# Altium PCB ResearchProject_V5.PcbDoc (part 1 of 2)
Units mm, origin at the board's own origin, x right, y up, seen from the top; angles counter-clockwise.
Board outline 152.49 x 130.17 mm, 4 copper layers (Top Layer, GND, 3V3, Bottom Layer), stack 0.603 mm thick; 150 components, 186 nets, 766 pads, 209 vias.
Unrouted connection lines stored in the file: 6.
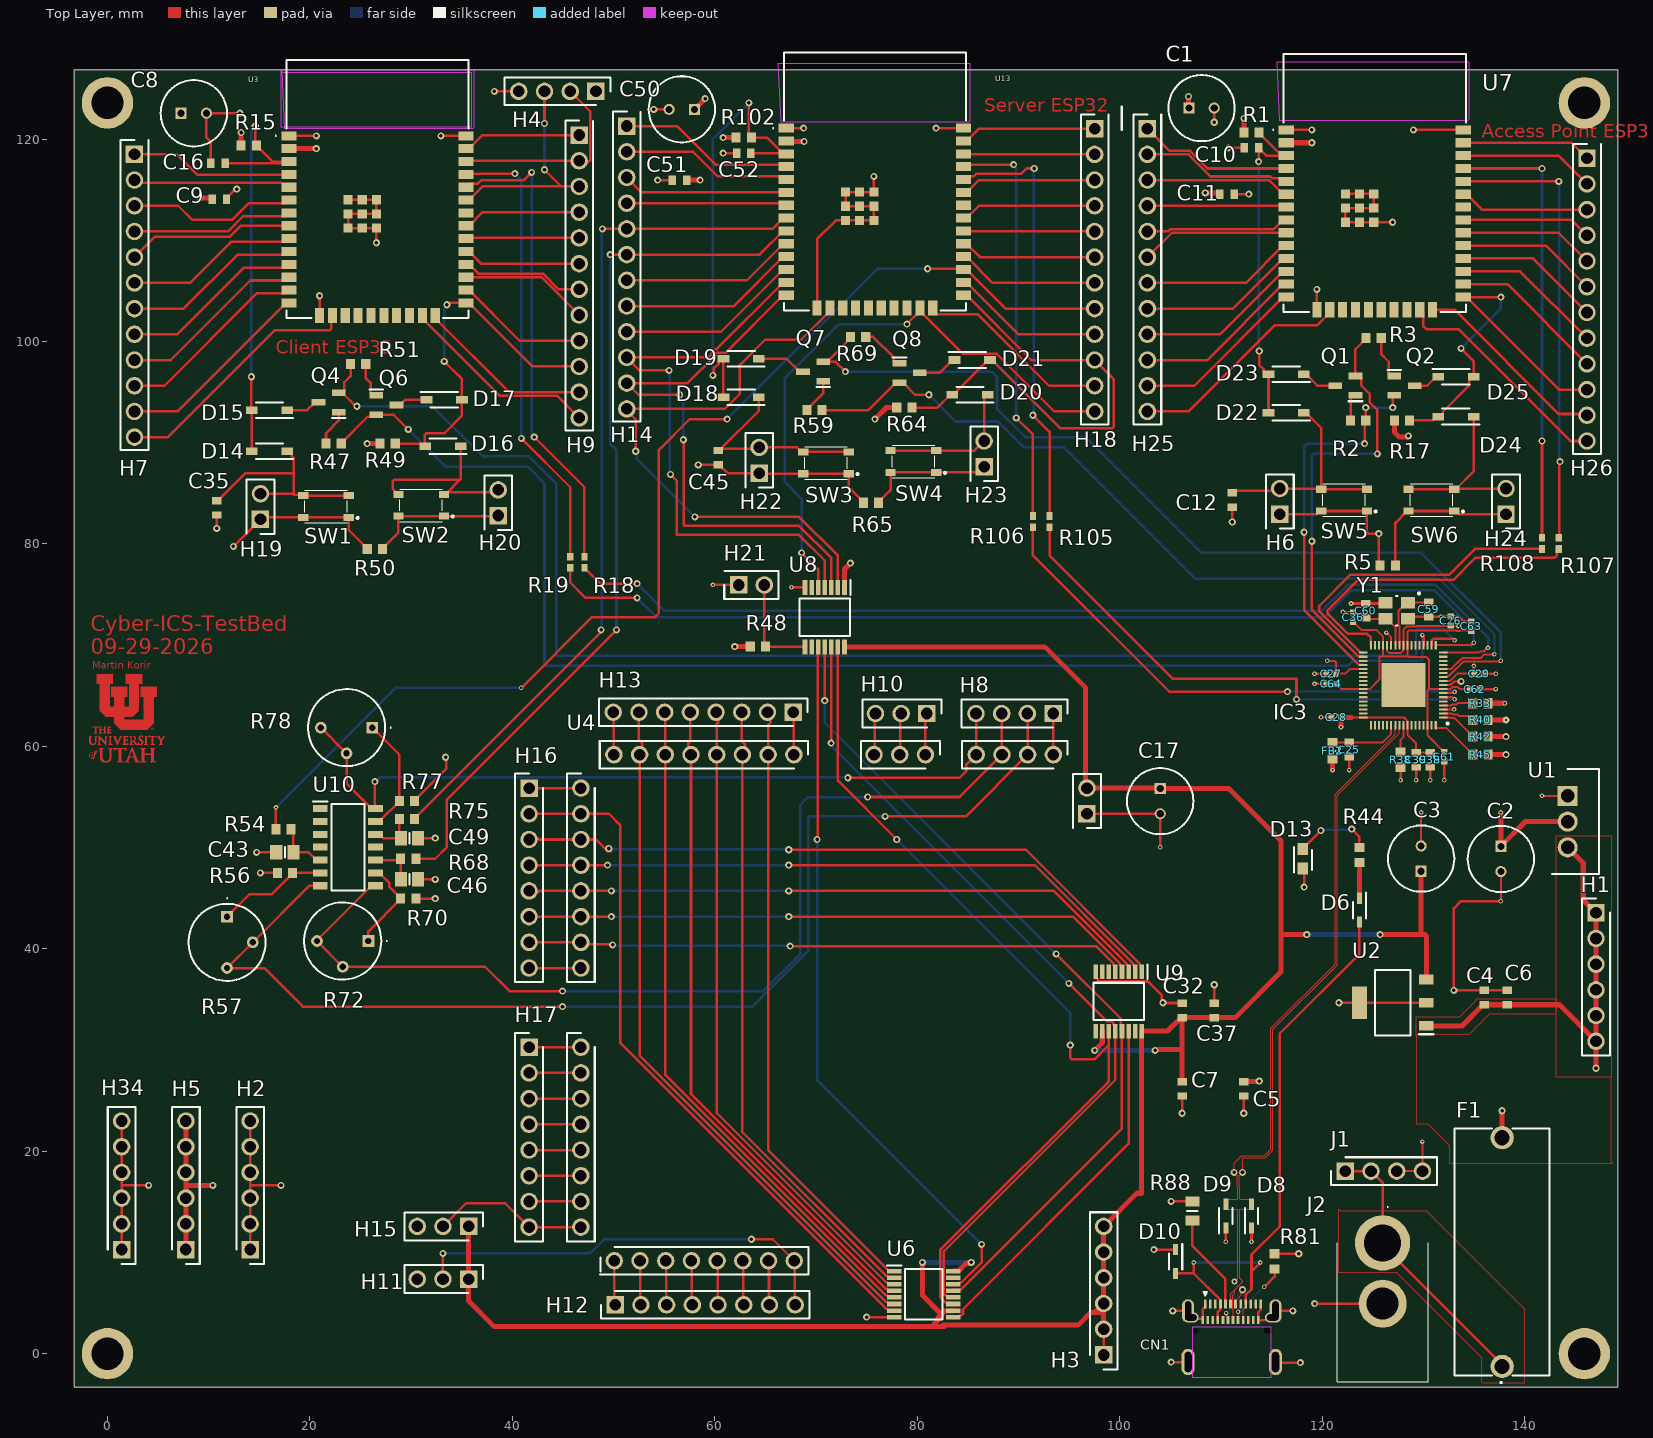
[diagram p0: Top Layer view]
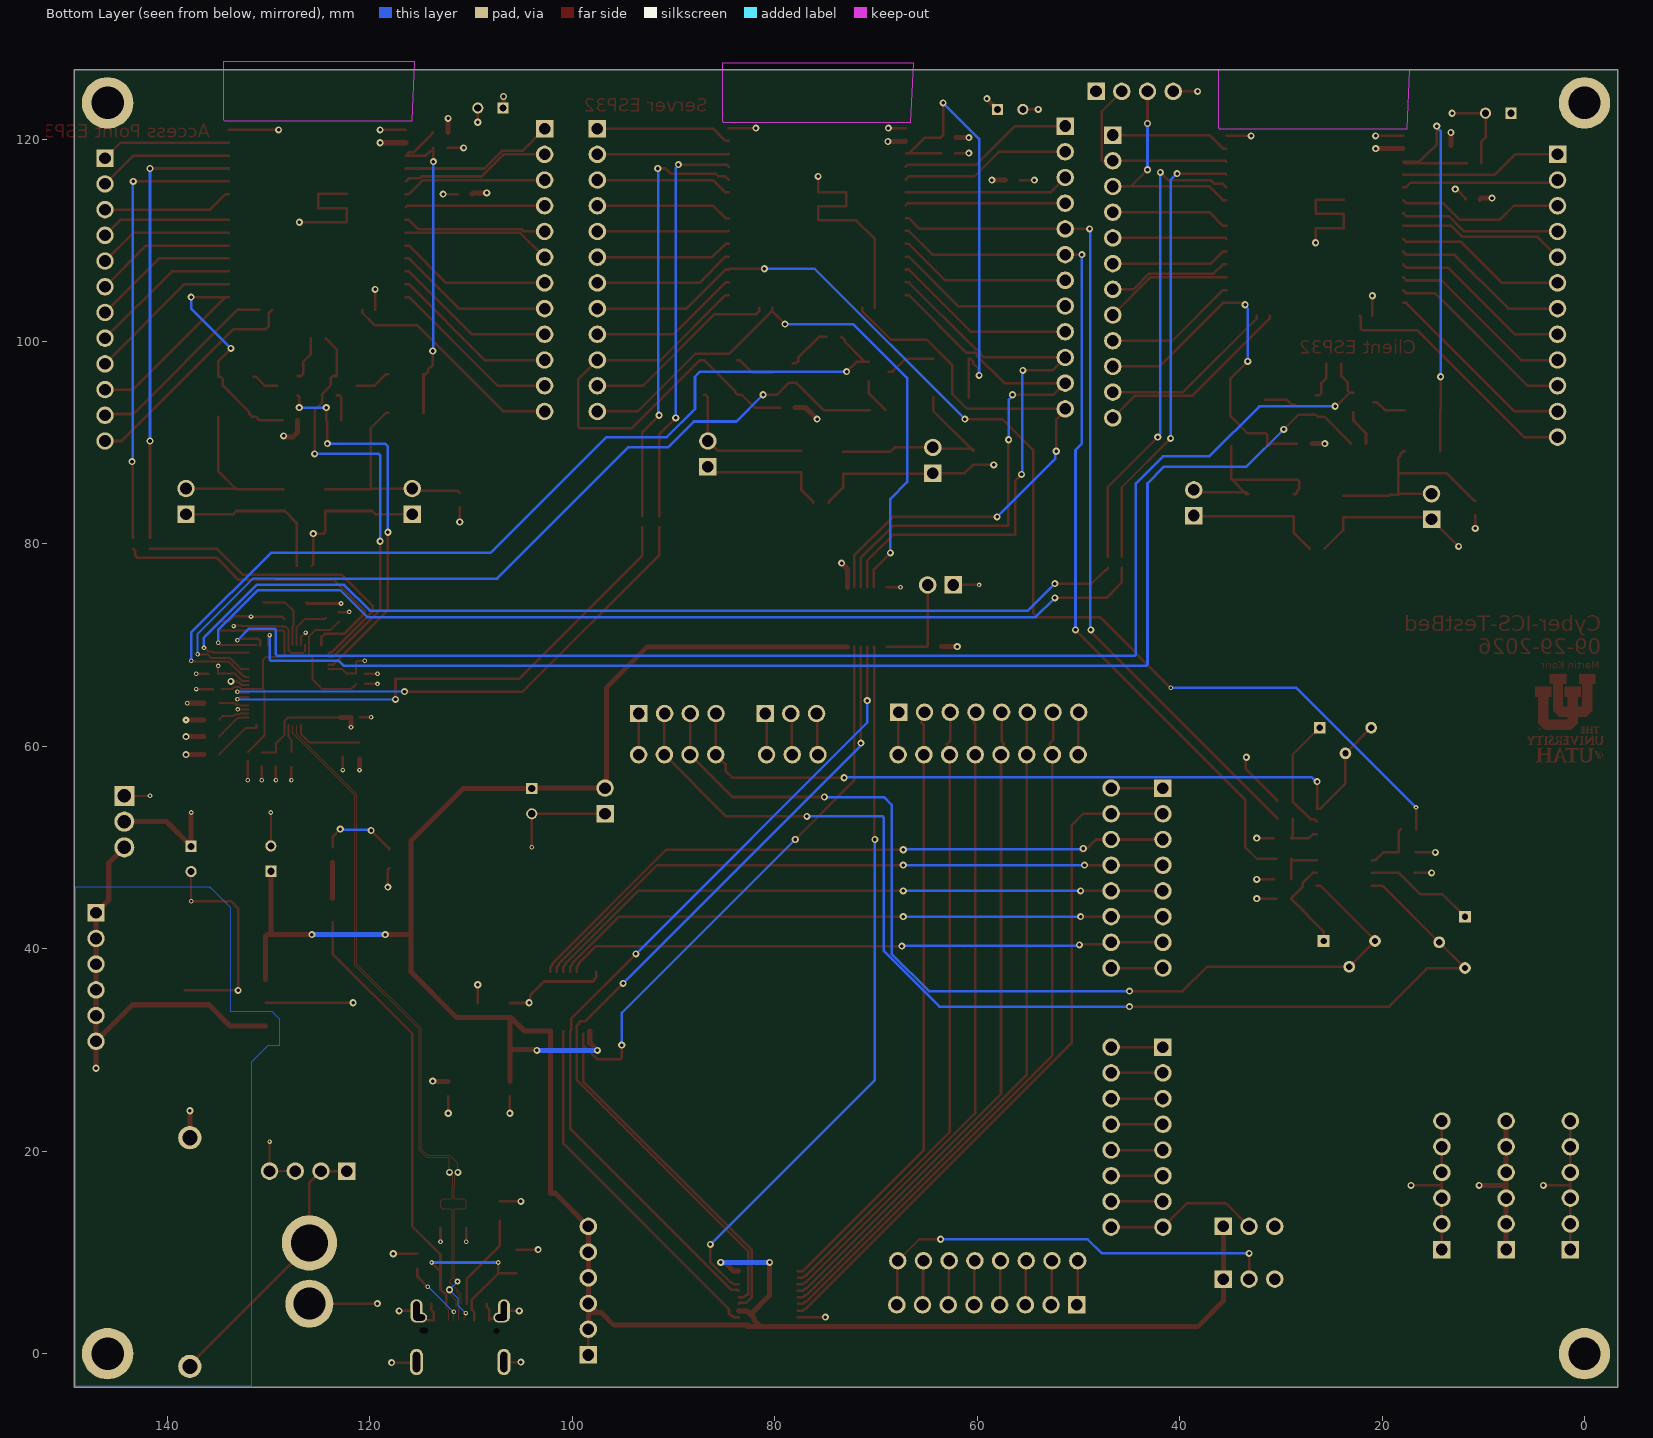
[diagram p1: Bottom Layer view, seen from below]
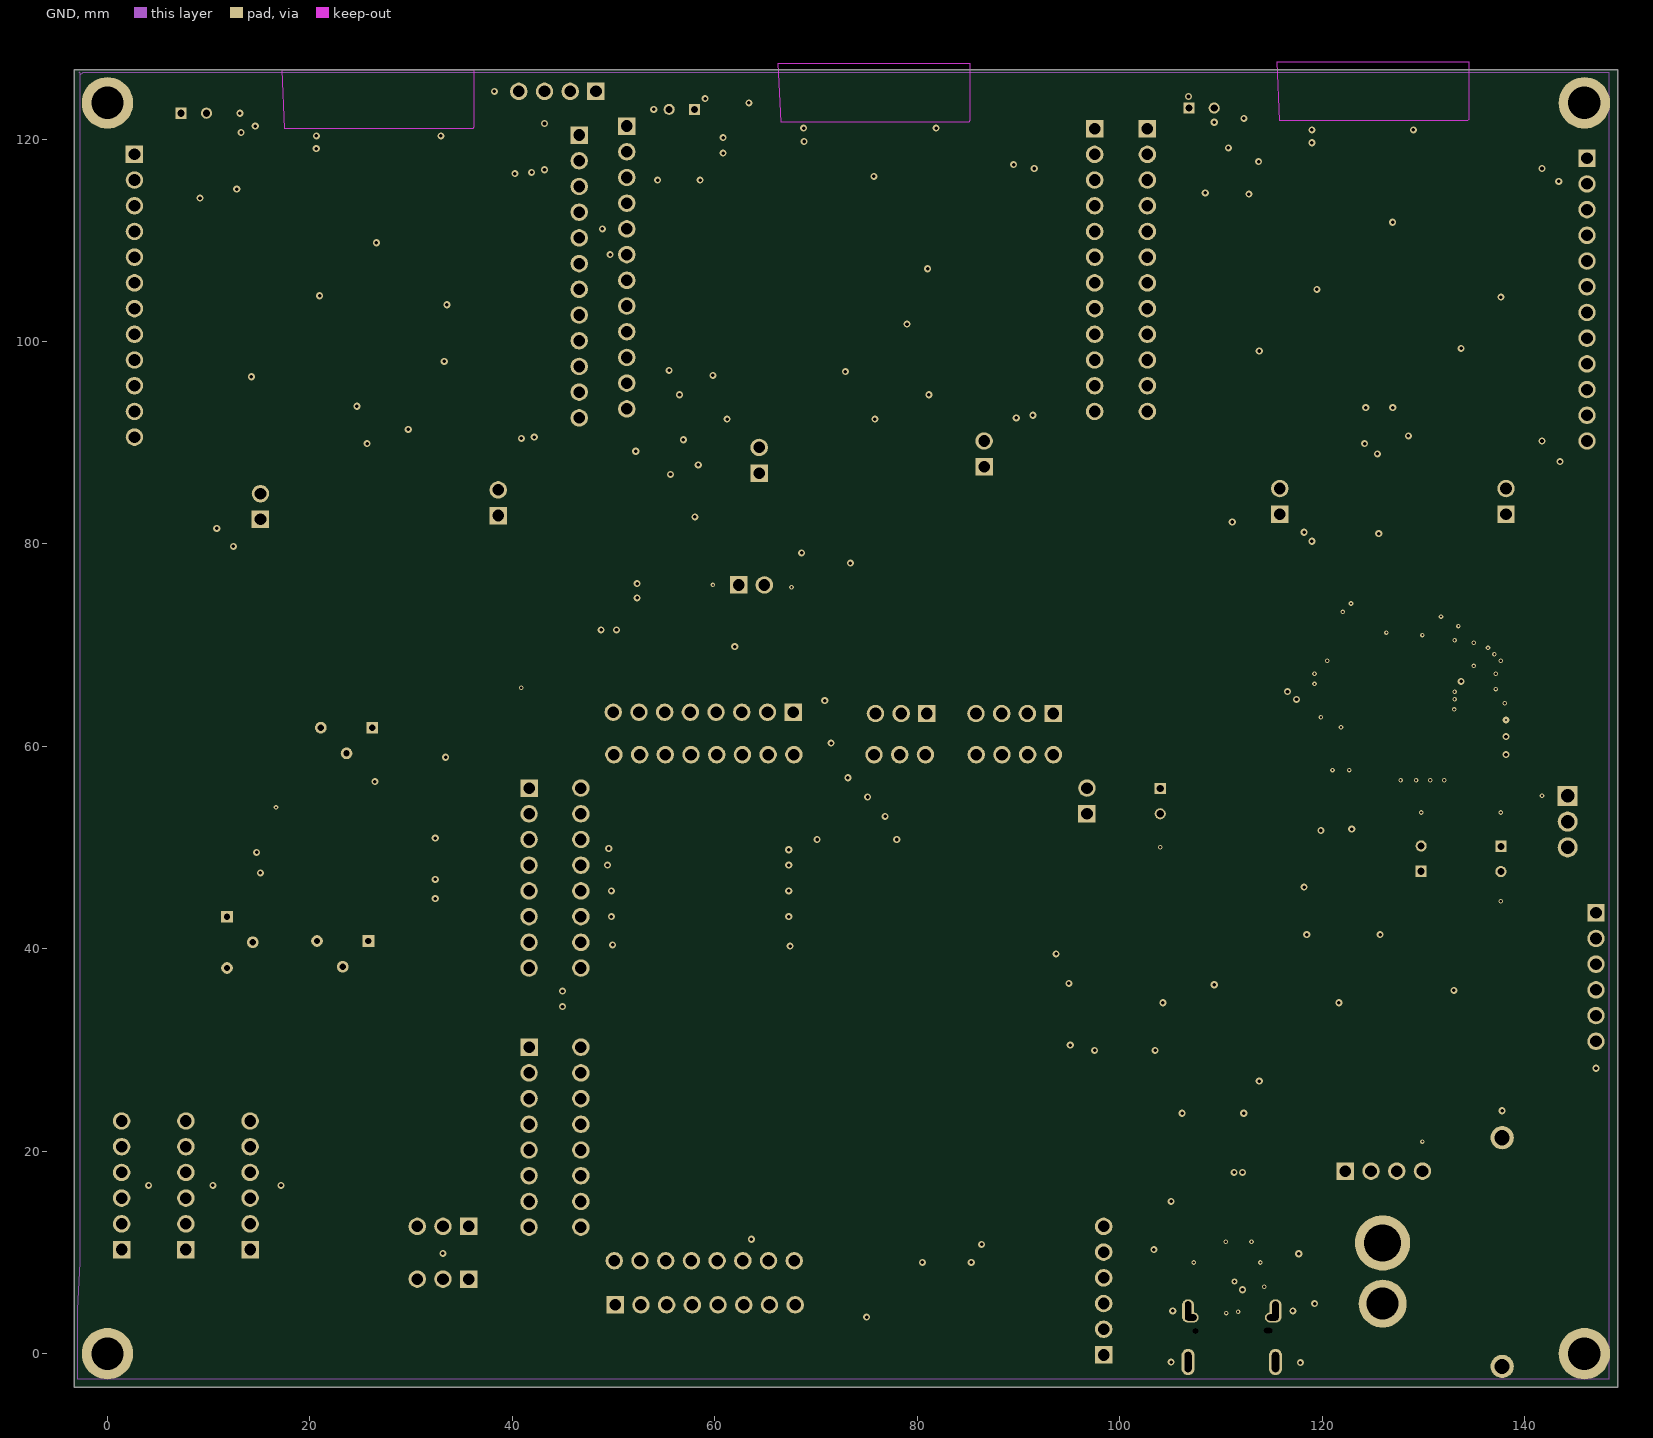
[diagram p2: GND]
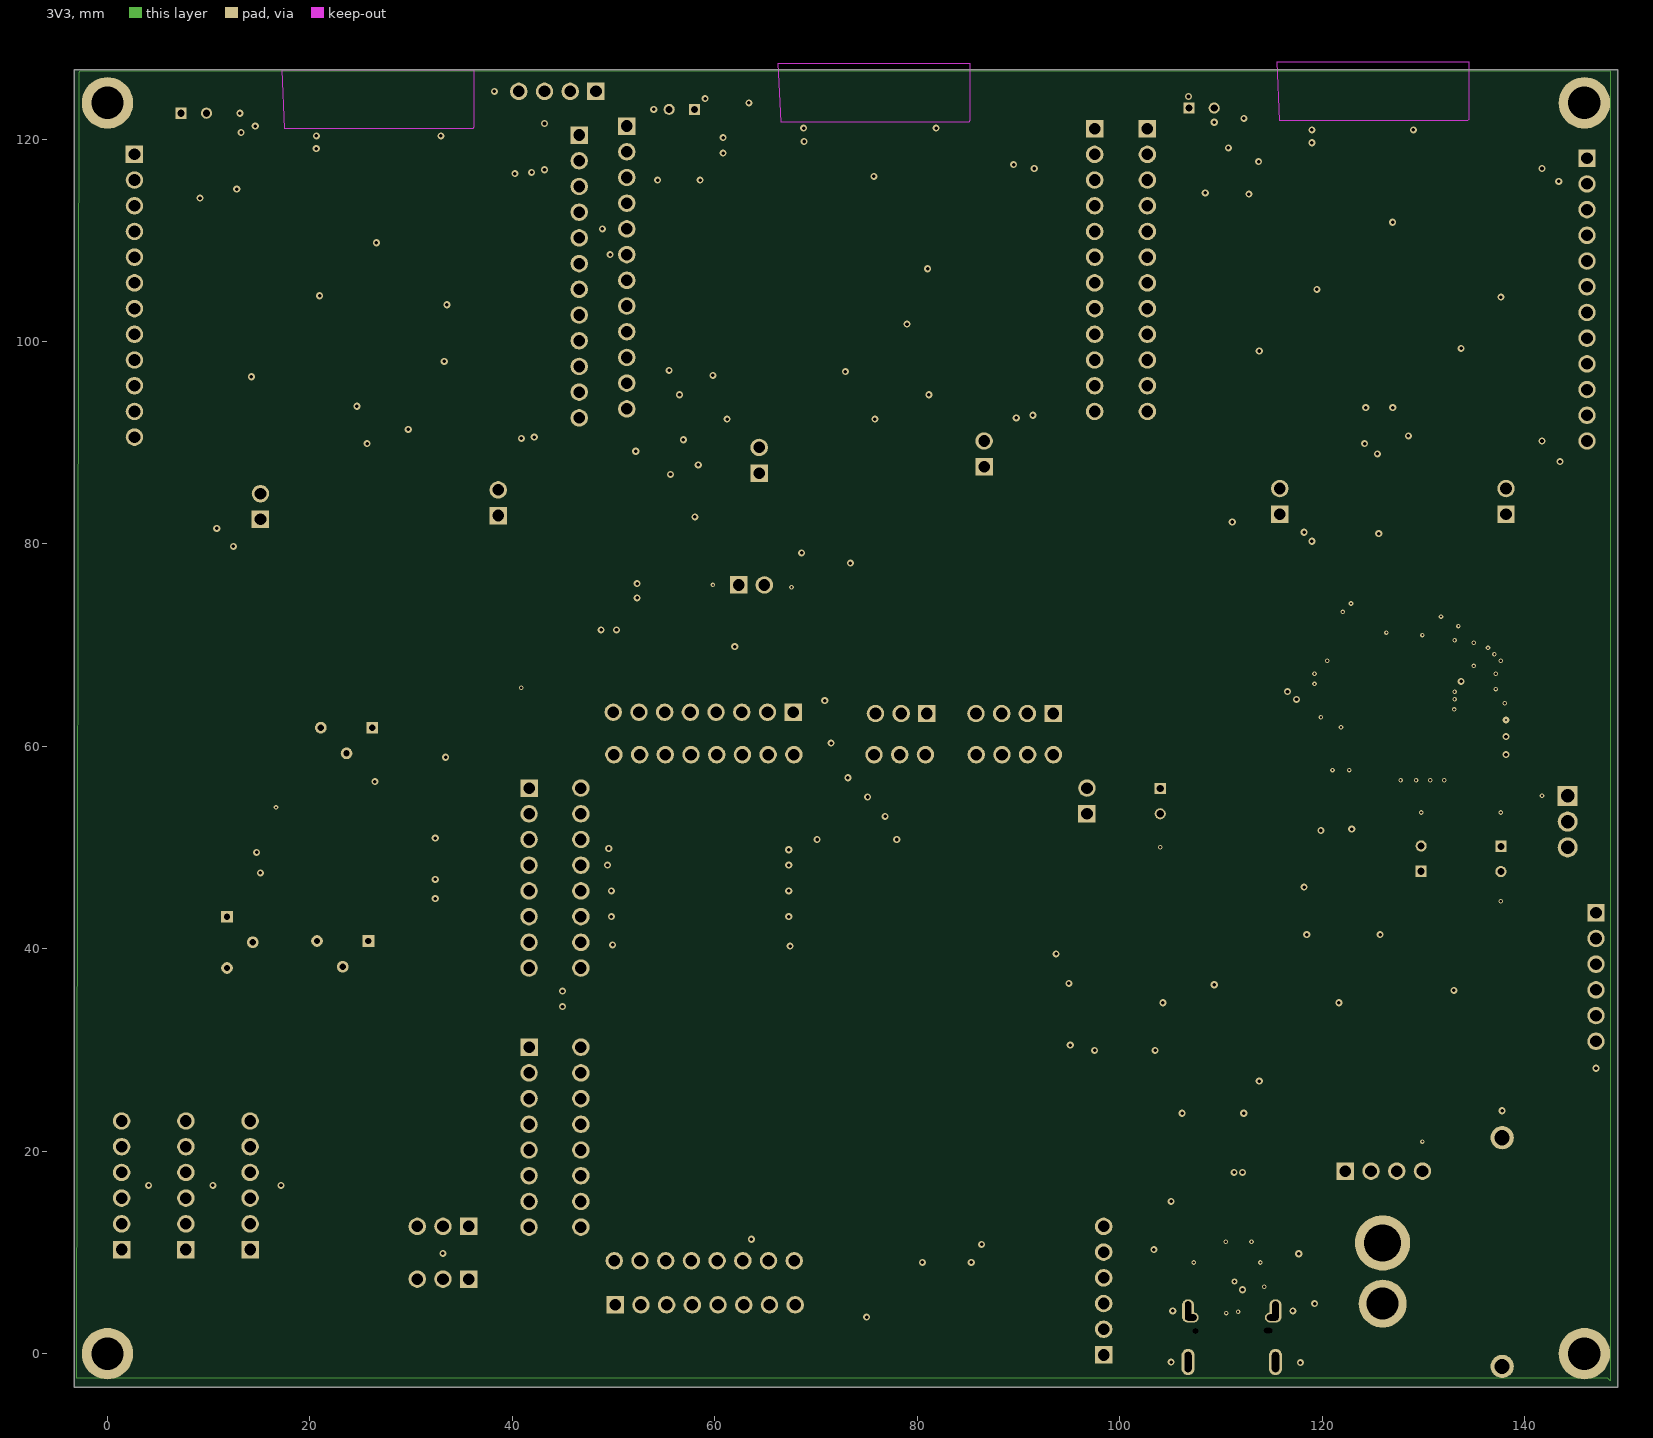
[diagram p3: 3V3]
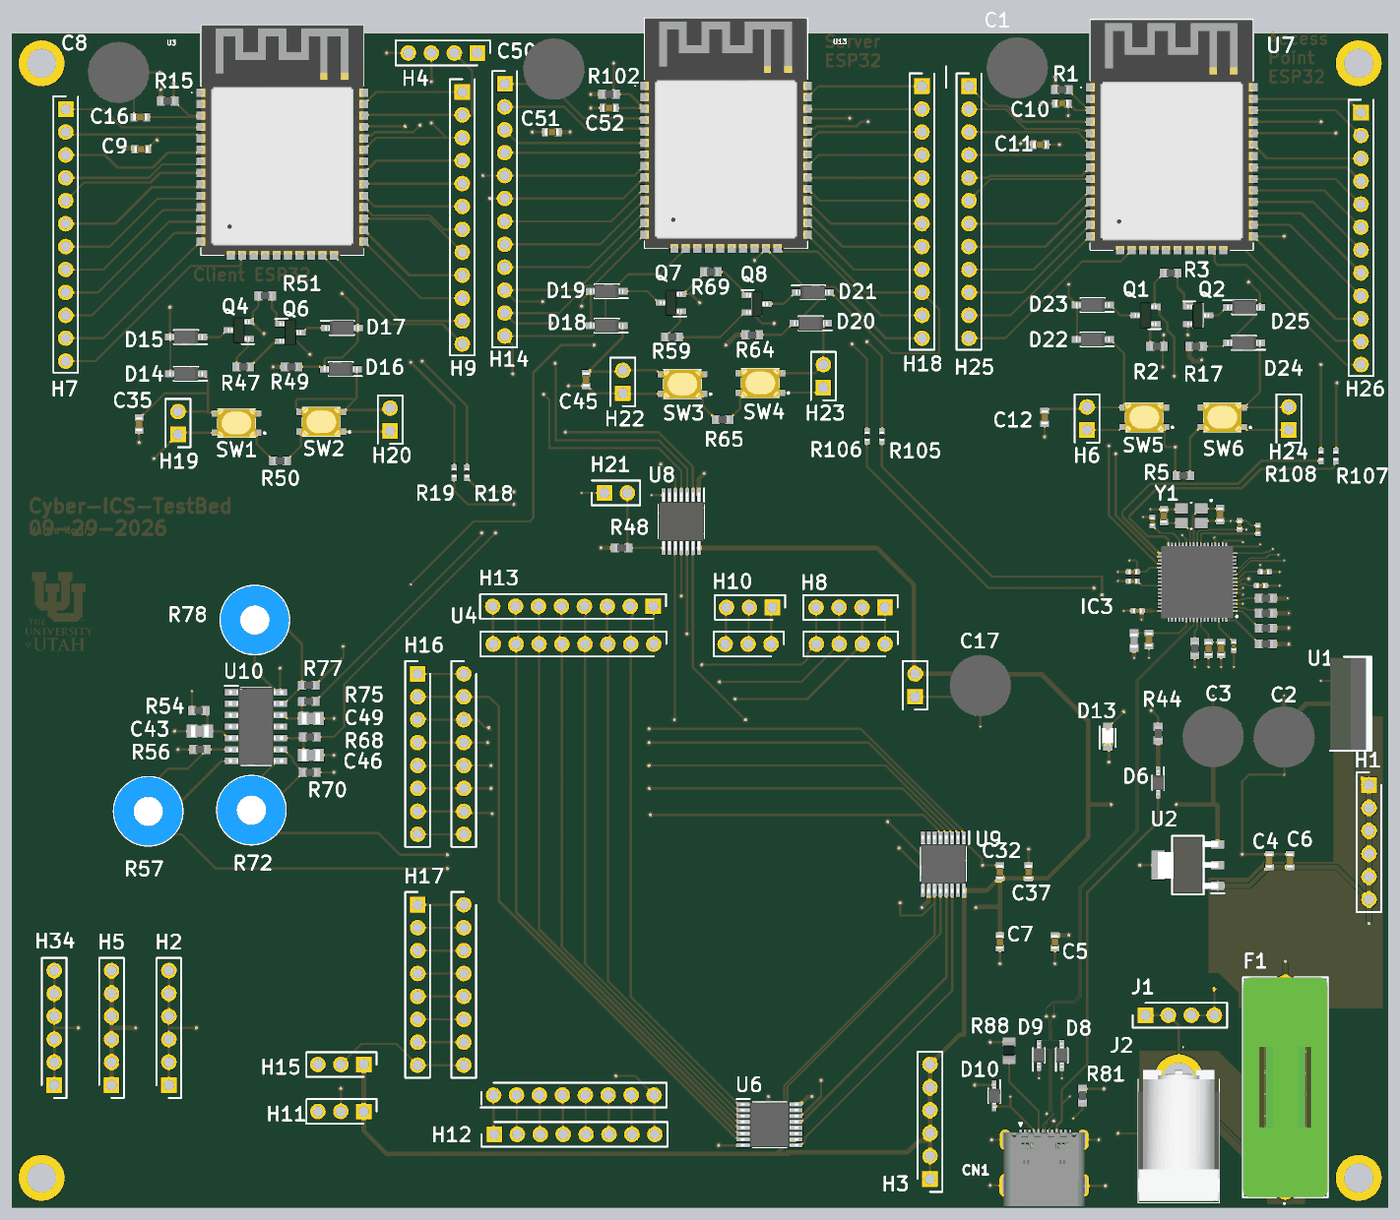
[diagram p5: 3D render of the assembled board from above, using the file's embedded part models]

## Layer stack, top to bottom
Top Solder: solder mask 0.0102, Solder Resist, Dk 3.5
Top Layer: signal copper 0.0356
Dielectric 2: prepreg 0.0711, PP-006, Dk 4.1
GND: signal copper 0.035
Dielectric 1: dielectric 0.32, FR-4, Dk 4.8
3V3: signal copper 0.035
Dielectric 3: prepreg 0.0711, PP-006, Dk 4.1
Bottom Layer: signal copper 0.0356
Bottom Solder: solder mask 0.0102, Solder Resist, Dk 3.5

## Board outline
-3.278,-3.302 -3.278,126.873 149.211,126.873 149.211,-3.302

## Design rules (kind name [scope] priority, off if disabled: settings)
BoardOutlineClearance [All] p1: gap=0.2 ignorepadtopadclearanceinfootprint=FALSE
Clearance [All] p1: gap=0.102 ignorepadtopadclearanceinfootprint=FALSE except(0.127: Arc-Via Track-Via SMDPad-Via THPad-Via Via-Via Via-Fill Via-Poly Via-Region Via-Text; 0.25: Arc-Hole Track-Hole SMDPad-Hole THPad-Hole Via-Hole Fill-Hole Poly-Hole Region-Hole Text-Hole)
ComponentClearance [All] p1: gap=0.102 collisioncheckmode=3 verticalgap=0.102 showdistances=TRUE
DiffPairsRouting [All] p1: maxlimit=0.102 minlimit=0.102 mostfreqgap=0.102 toplayer_minwidth=0.102 toplayer_maxwidth=1816.048 toplayer_prefwidth=0.102 midlayer1_minwidth=0.102 midlayer1_maxwidth=1816.048 midlayer1_prefwidth=0.102 midlayer2_minwidth=0.102 midlayer2_maxwidth=1816.048 midlayer2_prefwidth=0.102 bottomlayer_minwidth=0.102 bottomlayer_maxwidth=1816.048 bottomlayer_prefwidth=0.102 maxuncoupledlength=12.7
Height [All] p1: minheight=0 maxheight=1816.048 prefheight=12.7
HoleSize [All] p1: absolutevalues=TRUE maxlimit=6.3 minlimit=0.2 maxpercent=80.000 minpercent=20.000
HoleToHoleClearance [All] p1: gap=0.25 allowstackedmicrovias=FALSE
MinimumAnnularRing [All] p1: minimumring=0.076
MinimumSolderMaskSliver [All] p1: minsoldermaskwidth=0
PlaneClearance [All] p1: clearance=0.102
PlaneConnect PlaneConnectPowerPads [InPadClass('PowerPads')] p1: planeconnectstyle=Direct reliefexpansion=0.508 reliefentries=4 reliefconductorwidth=0.254 reliefairgap=0.254
PlaneConnect [All] p2: pad.planeconnectstyle=Relief pad.reliefexpansion=0.3 pad.reliefentries=4 pad.reliefconductorwidth=0.102 pad.reliefairgap=0.102 via.planeconnectstyle=Direct via.reliefexpansion=0.3 via.reliefentries=4 via.reliefconductorwidth=0.127 via.reliefairgap=0.127
PolygonConnect PolygonConnectPowerPads [All vs (InPadClass('PowerPads'))] p1: connectstyle=Direct reliefconductorwidth=0.254 reliefentries=4 polygonreliefangle="90 Angle" airgapwidth=0.254
PolygonConnect [All] p2: thpad.connectstyle=Relief thpad.reliefconductorwidth=0.102 thpad.reliefentries=4 thpad.polygonreliefangle="90 Angle" thpad.airgapwidth=0.102 smdpad.connectstyle=Relief smdpad.reliefconductorwidth=0.102 smdpad.reliefentries=4 smdpad.polygonreliefangle="90 Angle" smdpad.airgapwidth=0.102 via.connectstyle=Direct via.reliefconductorwidth=0.127 via.reliefentries=4 via.polygonreliefangle="90 Angle" via.airgapwidth=0.127
RoutingVias RoutingVias_USBC [All] p1: holewidth=0.225 width=0.45 viastyle="Through Hole" minholewidth=0.225 minwidth=0.45 maxholewidth=0.225 maxwidth=0.45
RoutingVias [All] p2: holewidth=0.35 width=0.7 viastyle="Through Hole" minholewidth=0.35 minwidth=0.7 maxholewidth=0.35 maxwidth=0.7
SilkToSilkClearance [All] p1: silktosilkclearance=0
SilkToSolderMaskClearance [IsPad] p1: minsilkscreentomaskgap=0.102 clearancetoexposedcopper=TRUE
SolderMaskExpansion [All] p1: expansion=0.075 istentingtop=FALSE
SupplyNets "Schematic Supply Nets_4" [InNet('3V3')] p1: voltage=0.000
SupplyNets "Schematic Supply Nets_3" [InNet('USB_VBUS')] p2: voltage=0.000
SupplyNets "Schematic Supply Nets_2" [InNet('+12.0')] p3: voltage=0.000
SupplyNets "Schematic Supply Nets_1" [InNet('+5.0')] p4: voltage=0.000
SupplyNets "Schematic Supply Nets" [InNet('GND')] p5: voltage=0.000
Width Width_power [InNetClass('Power')] p1: maxlimit=1 minlimit=0.2 preferedwidth=0.5 minimp=50.000000 maximp=50.000000 favimp=50.000000
Width [All] p2: maxlimit=2 minlimit=0.1 preferedwidth=0.2 minimp=50.000000 maximp=50.000000 favimp=50.000000
20 further rules are at their usual default settings.

## Classes and differential pairs
net class Power: 3V3 +5.0 +12.0 USB_VBUS
differential pair USB: +USB_P -USB_N

## Components (designator, comment, footprint, x,y, rotation, side; value= is the part's Value field where it differs from the comment)
C1 "100u" CAPTH6.3x11 106.847,123.063 r0 top
C2 "100u" CAPTH6.3x11 137.668,50.125 r270 top
C3 "100u" CAPTH6.3x11 129.794,47.665 r90 top
C4 "100n" CAP0603 136.017,35.179 r90 top
C5 "100n" CAP0603 112.268,26.162 r270 top
C6 "100n" CAP0603 138.303,35.179 r90 top
C7 "100n" CAP0603 106.172,26.162 r270 top
C8 "100u" CAPTH6.3x11 7.279,122.555 r0 top
C9 "1u" CAP0603 11.049,114.046 r0 top
C10 "1u" CAP0603 113.03,119.126 r180 top
C11 "1u" CAP0603 110.617,114.554 r0 top
C12 "100n" CAP0603 111.125,84.328 r90 top
C16 "1u" CAP0603 10.922,117.602 r180 top
C17 "100u" CAPTH6.3x11 104.013,55.84 r270 top
C25 "100n" CAP0603 122.682,59.69 r270 top
C26 "100n" CAP0402 132.715,72.39 r90 top
C27 "100n" CAP0402 120.904,67.183 r180 top
C28 "100n" CAP0402 121.412,62.865 r180 top
C29 "100n" CAP0402 135.509,67.183 r0 top
C32 "100n" CAP0603 106.172,33.909 r90 top
C35 "100n" CAP0603 10.795,83.566 r90 top
C36 "3.3u" CAP0402 123.063,72.771 r90 top
C37 "100n" CAP0603 109.347,33.909 r90 top
C38 "10u" CAP0603 130.683,58.674 r270 top
C39 "100n" CAP0603 129.286,58.674 r270 top
C43 "10u" CAP0805 17.526,49.53 r180 top
C45 "100n" CAP0603 60.325,88.519 r90 top
C46 "10u" CAP0805 29.845,46.863 r0 top
C49 "10u" CAP0805 29.845,50.927 r0 top
C50 "100u" CAPTH6.3x11 57.999,122.936 r180 top
C51 "1u" CAP0603 56.515,115.951 r180 top
C52 "1u" CAP0603 62.865,118.618 r180 top
C59 "27p" CAP0603 130.556,73.533 r270 top
C60 "27p" CAP0603 124.333,73.406 r90 top
C61 "100n" CAP0402 132.08,58.976 r270 top
C62 "100n" CAP0402 135.08,65.659 r0 top
C63 "100n" CAP0402 134.747,71.882 r90 top
C64 "100n" CAP0402 120.904,66.167 r180 top
CN1 "DX07S024JJ3R1300" JAE-DX07S024JJ3_V 111.081,2.221 r0 top
D6 "BAT60B" SOD323 123.698,43.815 r270 top
D8 "5V" SOD323 113.03,13.589 r90 top
D9 "5V" SOD323 110.49,13.589 r90 top
D10 "5V" SOD323 105.537,9.112 r270 top
D13 "LED" LEDM2012X80N 118.11,48.895 r90 top
D14 "1N4148" SOD123 16.002,89.154 r180 top
D15 "1N4148" SOD123 16.002,93.218 r180 top
D16 "1N4148" SOD123 33.147,89.662 r180 top
D17 "1N4148" SOD123 33.274,94.234 r0 top
D18 "1N4148" SOD123 62.611,94.488 r180 top
D19 "1N4148" SOD123 62.611,98.298 r180 top
D20 "1N4148" SOD123 85.217,94.742 r180 top
D21 "1N4148" SOD123 85.443,98.171 r0 top
D22 "1N4148" SOD123 116.459,92.964 r180 top
D23 "1N4148" SOD123 116.459,96.774 r180 top
D24 "1N4148" SOD123 133.223,92.583 r180 top
D25 "1N4148" SOD123 133.223,96.52 r0 top
F1 "Fuse" "Fuse Holder 5x20mm" 137.795,10.036 r90 top
FB2 "1.5k @ 100MHz" BEADC0603 121.031,59.563 r90 top
H1 "Header" Header_1X6 147.066,43.561 r270 top
H2 "Header" Header_1X6 14.097,10.287 r90 top
H3 "Header" Header_1X6 98.425,-0.127 r90 top
H4 "Header" Header_1X4 48.26,124.714 r180 top
H5 "Header" Header_1X6 7.747,10.287 r90 top
H6 "Header" Header_1X2 115.824,82.931 r90 top
H7 "Header" Header_1X12 2.667,118.491 r270 top
H8 "Header" Header_1X4 93.428,63.245 r180 top
H9 "Header" Header_1X12 46.609,120.396 r270 top
H10 "Header" Header_1X3 80.959,63.245 r180 top
H11 "Header" Header_1X3 35.687,7.366 r180 top
H12 "Header" Header_1X8 50.165,4.826 r0 top
H13 "Header" Header_1X8 67.751,63.372 r180 top
H14 "Header" Header_1X12 51.308,121.285 r270 top
H15 "Header" Header_1X3 35.687,12.573 r180 top
H16 "Header" Header_1X8 41.656,55.879 r270 top
H17 "Header" Header_1X8 41.656,30.279 r270 top
H18 "Header" Header_1X12 97.536,121.031 r270 top
H19 "Header" Header_1X2 15.113,82.423 r90 top
H20 "Header" Header_1X2 38.608,82.804 r90 top
H21 "Header" Header_1X2 62.357,75.946 r0 top
H22 "Header" Header_1X2 64.389,86.995 r90 top
H23 "Header" Header_1X2 86.614,87.63 r90 top
H24 "Header" Header_1X2 138.176,82.931 r90 top
H25 "Header" Header_1X12 102.743,121.031 r270 top
H26 "Header" Header_1X12 146.177,118.11 r270 top
H34 "Header" Header_1X6 1.397,10.287 r90 top
IC3 "FT4232HPQ-TRAY" QFN40P800X800X80-69N-D 128.035,66.053 r180 top
J1 "Header" Header_1X4 122.301,18.034 r0 top
J2 "PJ-037AH" PJ037AH 125.984,10.94 r90 top
Q1 "BC817-40" SOT23 122.301,95.631 r90 top
Q2 "BC817-40" SOT23 128.143,95.631 r270 top
Q4 "BC817-40" SOT23 21.844,93.98 r90 top
Q6 "BC817-40" SOT23 27.559,93.726 r270 top
Q7 "BC817-40" SOT23 69.723,97.028 r90 top
Q8 "BC817-40" SOT23 79.248,96.901 r270 top
R1 "10k" RESC0603 113.03,120.65 r0 top
R2 "100k" RESC0603 123.571,92.202 r180 top
R3 "100k" RESC0603 125.095,100.33 r0 top
R5 "1k" RESC0603 126.492,77.851 r180 top
R15 "10k" RESC0603 13.958,119.38 r0 top
R17 "20k" RESC0603 127.901,92.202 r180 top
R18 "0" RESC0402 47.117,78.19 r90 top
R19 "0" RESC0402 45.72,78.19 r90 top
R33 "1k" RESC0603 135.636,64.262 r0 top
R38 "12k" RESC0603 127.762,58.686 r270 top
R40 "10k" RESC0603 135.636,62.611 r180 top
R42 "10k" RESC0603 135.636,60.96 r180 top
R44 "2.2k" RESC0603 123.698,49.264 r270 top
R45 "10k" RESC0603 135.636,59.182 r0 top
R47 "100k" RESC0603 22.352,89.916 r180 top
R48 "10k" RESC0603 64.262,69.85 r180 top
R49 "20k" RESC0603 27.686,89.916 r180 top
R50 "1k" RESC0603 26.416,79.502 r180 top
R51 "100k" RESC0603 24.765,97.79 r0 top
R54 "10k" RESC0603 17.399,51.816 r0 top
R56 "12k" RESC0603 17.538,47.498 r0 top
R57 "10k" 3339P1103LF 11.811,43.18 r270 top
R59 "100k" RESC0603 69.85,93.218 r180 top
R64 "20k" RESC0603 78.728,93.472 r180 top
R65 "1k" RESC0603 75.438,84.074 r180 top
R68 "10k" RESC0603 29.718,48.895 r180 top
R69 "100k" RESC0603 74.168,100.457 r0 top
R70 "12k" RESC0603 29.718,44.958 r180 top
R72 "10k" 3339P1103LF 25.781,40.767 r180 top
R75 "10k" RESC0603 29.591,52.832 r180 top
R77 "12k" RESC0603 29.591,54.61 r180 top
R78 "10k" 3339P1103LF 26.162,61.849 r180 top
R81 "12k" RESC0603 115.316,9.125 r90 top
R88 "5.11k" RESC0805 107.188,14.097 r90 top
R102 "10k" RESC0603 62.865,120.142 r0 top
R105 "0" RESC0402 93.091,82.211 r90 top
R106 "0" RESC0402 91.44,82.211 r90 top
R107 "0" RESC0402 143.383,80.052 r90 top
R108 "0" RESC0402 141.732,80.052 r90 top
SW1 "Tactile Switch - 1" "Tactile Button 4.2mm x 3.2mm" 21.59,83.693 r180 top
SW2 "Tactile Switch - 1" "Tactile Button 4.2mm x 3.2mm" 30.988,83.82 r180 top
SW3 "Tactile Switch - 1" "Tactile Button 4.2mm x 3.2mm" 70.993,88.011 r180 top
SW4 "Tactile Switch - 1" "Tactile Button 4.2mm x 3.2mm" 79.629,88.138 r180 top
SW5 "Tactile Switch - 1" "Tactile Button 4.2mm x 3.2mm" 122.174,84.328 r180 top
SW6 "Tactile Switch - 1" "Tactile Button 4.2mm x 3.2mm" 130.81,84.328 r180 top
U1 "LD1086V33-DG" TO-220-3 144.272,55.118 r270 top
U2 "AZ1117CH2-5.0TRG1" SOT223 127,34.671 r180 top
U3 "ESP32-WROOM-32E-N8" ESP32WROOM32EN8 26.67,115.062 r0 top
U4 "eACE 5150v5" eACEv5150 96.474,58.879 r270 top
U6 "74HC595" TSSOP16 80.649,5.883 r0 top
U7 "ESP32-WROOM-32E-N8" ESP32WROOM32EN8 125.209,115.644 r0 top
U8 "LSF0204DPWR" TSSOP14 70.866,72.771 r270 top
U9 "74HC595" TSSOP16 99.908,34.794 r270 top
U10 "LM324" SOIC14 23.749,50.038 r0 top
U13 "ESP32-WROOM-32E-N8" ESP32WROOM32EN8 75.819,115.824 r0 top
Y1 "LFXTAL056346" WE-XTAL_LFXTAL056346 127.381,73.406 r180 top

## Footprints (in the part's own frame and the unit in brackets; to place one, negate y for a bottom-side part, rotate by r counter-clockwise, add the part's x,y. Pads: shape width x height; smd on the part's side, far side on the other; paste and mask are expansions set on the pad)
3339P1103LF [mm]
  rect 1.155x1.155 hole 0.63: 1(0,0)
  round 1.155 hole 0.63: 2(2.54,2.54) 3(5.08,0)
  silkscreen extent -1.86,-3.81 6.35,3.81, body extent -1.27,-3.81 6.35,3.81, height 6.42
BEADC0603 [mm]
  rect 0.9x1 smd: 1(-0.8,0) 2(0.8,0)
  silkscreen extent 0,-0.3 0,0.3, body extent -0.8,-0.4 0.8,0.4, height 0.95
CAP0402 [mm]
  rect 0.6x0.62 smd: 1(-0.46,0) 2(0.46,0)
  body extent -0.5,-0.25 0.5,0.25, height 0.55
CAP0603 [mm]
  rect 0.73x0.94 smd: 1(-0.71,0) 2(0.71,0)
  body extent -0.8,-0.4 0.8,0.4, height 0.9
CAP0805 [mm]
  rect 1.2x1.45 smd: 1(-0.85,0) 2(0.85,0)
  silkscreen extent 0,-0.53 0,0.53, body extent -1,-0.63 1,0.63, height 1.1
CAPTH6.3x11 [mm]
  rect 1.1x1.1 hole 0.7: 1(0,0)
  round 1.1 hole 0.7: 2(2.5,0)
  silkscreen extent -2.02,-3.27 4.52,3.27, body extent -2.14,-3.4 4.65,3.4, height 13
eACEv5150 [mm]
  rect 1.725x1.725 hole 1.15: 1(5.54,0.3)
  round 1.725 hole 1.15: 2(3,0.3) 3(-0.3,-3.02) 4(-0.3,-5.56) 5(-0.3,-8.1) 6(-0.3,-10.64) 7(-0.3,-15.66) 8(-0.3,-18.2) 9(-0.3,-20.74) 10(-0.3,-28.66) 11(-0.3,-31.2) 12(-0.3,-33.74) 13(-0.3,-36.28) 14(-0.3,-38.82) 15(-0.3,-41.36) 16(-0.3,-43.9) 17(-0.3,-46.44) 18(3,-49.7) 19(5.54,-49.7) 20(8.08,-49.7) 21(10.62,-49.7) 22(13.16,-49.7) 23(15.7,-49.7) 24(18.24,-49.7) 25(20.78,-49.7) 26(28.6,-49.7) 27(31.14,-49.7) 28(33.68,-49.7) 29(36.22,-49.7) 30(38.76,-49.7) 31(41.3,-49.7) 32(43.84,-49.7) 33(46.38,-49.7) 34(49.7,-46.4) 35(49.7,-43.86) 36(49.7,-41.32) 37(49.7,-38.78) 38(49.7,-36.24) 39(49.7,-33.7) 40(49.7,-31.16) 41(49.7,-28.62)
  silkscreen extent -1.67,-51.07 51.07,1.68, body extent 0,-49.34 49.38,0.04, height 8.89
ESP32WROOM32EN8 [mm]
  rect 1.5x0.9 smd: 1(-8.75,5.26) 2(-8.75,3.99) 3(-8.75,2.72) 4(-8.75,1.45) 5(-8.75,0.18) 6(-8.75,-1.09) 7(-8.75,-2.36) 8(-8.75,-3.63) 9(-8.75,-4.9) 10(-8.75,-6.17) 11(-8.75,-7.44) 12(-8.75,-8.71) 13(-8.75,-9.98) 14(-8.75,-11.25) 25(8.75,-11.25) 26(8.75,-9.98) 27(8.75,-8.71) 28(8.75,-7.44) 29(8.75,-6.17) 30(8.75,-4.9) 31(8.75,-3.63) 32(8.75,-2.36) 33(8.75,-1.09) 34(8.75,0.18) 35(8.75,1.45) 36(8.75,2.72) 37(8.75,3.99) 38(8.75,5.26)
  rect 0.9x1.5 smd: 15(-5.715,-12.5) 16(-4.445,-12.5) 17(-3.175,-12.5) 18(-1.905,-12.5) 19(-0.635,-12.5) 20(0.635,-12.5) 21(1.905,-12.5) 22(3.175,-12.5) 23(4.445,-12.5) 24(5.715,-12.5)
  rect 0.9x0.9 smd: 39(-2.9,-1.06) 40(-2.9,-2.46) 41(-2.9,-3.86) 42(-1.5,-3.86) 43(-0.1,-3.86) 44(-0.1,-2.46) 45(-0.1,-1.06) 46(-1.5,-1.06) 47(-1.5,-2.46)
  silkscreen extent -10.1,-12.75 9,12.75, body extent -9,-12.75 9,12.75, height 3.13
"Fuse Holder 5x20mm" [mm]
  round 2.3 hole 1.5: 1(-11.3,0) 2(11.3,0)
  silkscreen extent -12.95,-4.7 12.2,4.7, body extent -12.2,-4.7 12.2,4.7, height 13.36
Header_1X2 [mm]
  rect 1.725x1.725 hole 1.15: 1(0,0)
  round 1.725 hole 1.15: 2(2.54,0)
  silkscreen extent -1.42,-1.38 3.95,1.37
Header_1X3 [mm]
  rect 1.725x1.725 hole 1.15: 1(0,0)
  round 1.725 hole 1.15: 2(2.54,0) 3(5.08,0)
  silkscreen extent -1.42,-1.37 6.35,1.37
Header_1X4 [mm]
  rect 1.725x1.725 hole 1.15: 1(0,0)
  round 1.725 hole 1.15: 2(2.54,0) 3(5.08,0) 4(7.62,0)
  silkscreen extent -1.42,-1.37 9.04,1.37
Header_1X6 [mm]
  rect 1.725x1.725 hole 1.15: 1(0,0)
  round 1.725 hole 1.15: 2(2.54,0) 3(5.08,0) 4(7.62,0) 5(10.16,0) 6(12.7,0)
  silkscreen extent -1.42,-1.37 14.1,1.37
Header_1X8 [mm]
  rect 1.725x1.725 hole 1.15: 1(0,0)
  round 1.725 hole 1.15: 2(2.54,0) 3(5.08,0) 4(7.62,0) 5(10.16,0) 6(12.7,0) 7(15.24,0) 8(17.78,0)
  silkscreen extent -1.42,-1.37 19.18,1.37
Header_1X12 [mm]
  rect 1.725x1.725 hole 1.15: 1(0,0)
  round 1.725 hole 1.15: 2(2.54,0) 3(5.08,0) 4(7.62,0) 5(10.16,0) 6(12.7,0) 7(15.24,0) 8(17.78,0) 9(20.32,0) 10(22.86,0) 11(25.4,0) 12(27.94,0)
  silkscreen extent -1.42,-1.37 29.21,1.37
JAE-DX07S024JJ3_V [mm] "THD, 24-Leads, Body 8.17x8.94mm, Pitch 0.5mm"
  oval 1.2x2.3 hole 0.6 slot 1.9 at 90 deg: 1(-4.32,2) 2(4.32,2)
  oval 1.5x1 hole 0.6 slot 1.1 at 0 deg: 1(-4.02,1.35) 2(4.02,1.35)
  oval 1.3x2.6 hole 0.7 slot 2 at 90 deg: 3(-4.32,-3.05) 4(4.32,-3.05)
  rrect25% 0.27x0.9 smd: A1(-2.625,2.7) A2(-2.125,2.7) A3(-1.625,2.7) A4(-1.125,2.7) A5(-0.625,2.7) A6(-0.125,2.7) A7(0.375,2.7) A8(0.875,2.7) A9(1.375,2.7) A10(1.875,2.7) A11(2.375,2.7) A12(2.875,2.7)
  rrect25% 0.27x0.8 smd: B1(2.625,1.1) B2(2.125,1.1) B3(1.625,1.1) B4(1.125,1.1) B5(0.625,1.1) B6(0.125,1.1) B7(-0.375,1.1) B8(-0.875,1.1) B9(-1.375,1.1) B10(-1.875,1.1) B11(-2.375,1.1) B12(-2.875,1.1)
  round 0 hole 0.6 unplated: H1(-3.6,0)
  round 0 hole 0.5 slot 0.85 at 0 deg unplated: H2(3.6,0.065)
  Top Layer keep-out region: -3.9,-4.55 3.9,-4.55 3.9,0.4 -3.9,0.4
  silkscreen extent -2.83,3.49 -2.43,3.89, body extent -4.47,-5.35 4.47,2.8, height 3.16
LEDM2012X80N [mm]
  rect 1.2x1.05 smd: 1(-0.95,0) 2(0.95,0)
  silkscreen extent -1.33,-0.89 1.14,0.89, body extent -1,-0.63 1,0.63, height 0.7
PJ037AH [mm]
  round 5.46 hole 3.64: 1(0,0)
  round 4.74 hole 3.16: 2(-6,0)
  silkscreen extent -13.7,-4.5 3.6,4.5, body extent -13.5,-4.5 1,4.5, height 11
QFN40P800X800X80-69N-D [mm]
  rect 0.85x0.2 smd: 1(-3.95,3.2) 2(-3.95,2.8) 3(-3.95,2.4) 4(-3.95,2) 5(-3.95,1.6) 6(-3.95,1.2) 7(-3.95,0.8) 8(-3.95,0.4) 9(-3.95,0) 10(-3.95,-0.4) 11(-3.95,-0.8) 12(-3.95,-1.2) 13(-3.95,-1.6) 14(-3.95,-2) 15(-3.95,-2.4) 16(-3.95,-2.8) 17(-3.95,-3.2) 35(3.95,-3.2) 36(3.95,-2.8) 37(3.95,-2.4) 38(3.95,-2) 39(3.95,-1.6) 40(3.95,-1.2) 41(3.95,-0.8) 42(3.95,-0.4) 43(3.95,0) 44(3.95,0.4) 45(3.95,0.8) 46(3.95,1.2) 47(3.95,1.6) 48(3.95,2) 49(3.95,2.4) 50(3.95,2.8) 51(3.95,3.2)
  rect 0.2x0.85 smd: 18(-3.2,-3.95) 19(-2.8,-3.95) 20(-2.4,-3.95) 21(-2,-3.95) 22(-1.6,-3.95) 23(-1.2,-3.95) 24(-0.8,-3.95) 25(-0.4,-3.95) 26(0,-3.95) 27(0.4,-3.95) 28(0.8,-3.95) 29(1.2,-3.95) 30(1.6,-3.95) 31(2,-3.95) 32(2.4,-3.95) 33(2.8,-3.95) 34(3.2,-3.95) 52(3.2,3.95) 53(2.8,3.95) 54(2.4,3.95) 55(2,3.95) 56(1.6,3.95) 57(1.2,3.95) 58(0.8,3.95) 59(0.4,3.95) 60(0,3.95) 61(-0.4,3.95) 62(-0.8,3.95) 63(-1.2,3.95) 64(-1.6,3.95) 65(-2,3.95) 66(-2.4,3.95) 67(-2.8,3.95) 68(-3.2,3.95)
  rect 4.35x4.35 smd: 69(0,0)
  silkscreen extent -4.47,3.7 -4.28,3.9, body extent -4.05,-4.05 4.05,4.05, height 0.8
RESC0402 [mm]
  rect 0.75x0.6 smd: 1(-0.55,0) 2(0.55,0)
  body extent -0.5,-0.25 0.5,0.25, height 0.4
RESC0603 [mm]
  rect 0.9x1 smd: 1(-0.75,0) 2(0.75,0)
  body extent -0.77,-0.4 0.78,0.4, height 0.45
RESC0805 [mm]
  rect 1x1.4 smd: 1(-0.95,0) 2(0.95,0)
  silkscreen extent 0,-0.53 0,0.53, body extent -1,-0.63 1,0.63, height 0.5
SOD123 [mm]
  rect 1.15x0.75 smd: 1(-1.75,0) 2(1.75,0)
  silkscreen extent -2.32,-0.77 1.35,0.77, body extent -1.85,-0.77 1.85,0.77, height 1.35
SOD323 [mm]
  rect 1.1x0.5 smd: 1(-1.175,0) 2(1.175,0)
  silkscreen extent -1.73,-0.65 0.8,0.65, body extent -1.33,-0.65 1.33,0.65, height 1.1
SOIC14 [mm]
  rect 1.462x0.7 smd: 1(-2.719,3.81) 2(-2.719,2.54) 3(-2.719,1.27) 4(-2.719,0) 5(-2.719,-1.27) 6(-2.719,-2.54) 7(-2.719,-3.81) 8(2.719,-3.81) 9(2.719,-2.54) 10(2.719,-1.27) 11(2.719,0) 12(2.719,1.27) 13(2.719,2.54) 14(2.719,3.81)
  silkscreen extent -3.45,-4.28 1.64,4.51, body extent -3,-4.28 3,4.28, height 1.8
SOT23 [mm]
  rect 0.65x1.35 smd: 1(-0.96,-1) 2(0.96,-1) 3(0,1)
  silkscreen extent -1.54,-1.68 -1.54,-0.33, body extent -1.45,-1.2 1.45,1.2, height 0.95
SOT223 [mm]
  rect 1.45x0.95 smd: 1(-3.3,2.29) 2(-3.3,0) 3(-3.3,-2.29)
  rect 1.45x3.25 smd: 4(3.3,0)
  silkscreen extent -4.03,-3.25 1.75,3.25, body extent -3.35,-3.15 3.35,3.15, height 1.8
"Tactile Button 4.2mm x 3.2mm" [mm]
  rect 1x0.7 smd: 1(-2.25,1.075) 2(2.25,1.075) 3(-2.25,-1.075) 4(2.25,-1.075)
  silkscreen extent -3.22,-1.6 2.1,1.61, body extent -2.3,-1.6 2.3,1.6, height 2.6
TO-220-3 [mm]
  rect 1.98x1.98 hole 1.32: 1(0,0)
  round 1.98 hole 1.32: 2(2.55,0) 3(5.1,0)
  silkscreen extent -2.65,-1.53 7.75,3.07, body extent -2.55,-1.53 7.65,3.07, height 19.22
TSSOP14 [mm]
  rect 1.475x0.45 smd: 1(-2.938,1.95) 2(-2.938,1.3) 3(-2.938,0.65) 4(-2.938,0) 5(-2.938,-0.65) 6(-2.938,-1.3) 7(-2.938,-1.95) 8(2.938,-1.95) 9(2.938,-1.3) 10(2.938,-0.65) 11(2.938,0) 12(2.938,0.65) 13(2.938,1.3) 14(2.938,1.95)
  silkscreen extent -3.67,-2.5 1.85,2.52, body extent -3.2,-2.5 3.2,2.5, height 1.13
TSSOP16 [mm]
  rect 1.45x0.45 smd: 1(-2.925,2.275) 2(-2.925,1.625) 3(-2.925,0.975) 4(-2.925,0.325) 5(-2.925,-0.325) 6(-2.925,-0.975) 7(-2.925,-1.625) 8(-2.925,-2.275) 9(2.925,-2.275) 10(2.925,-1.625) 11(2.925,-0.975) 12(2.925,-0.325) 13(2.925,0.325) 14(2.925,0.975) 15(2.925,1.625) 16(2.925,2.275)
  silkscreen extent -3.65,-2.5 1.85,2.85, body extent -3.2,-2.5 3.2,2.5, height 1.2
WE-XTAL_LFXTAL056346 [mm]
  rect 1.4x1.15 smd paste+0 mask+0.102: 1(-1.1,-0.8) 2(1.1,-0.8) 3(1.1,0.8) 4(-1.1,0.8)
  silkscreen extent -2.3,-1.8 0.05,1.45

## Part data
C1 C4 C5 C6 C7 C8 C9 C10 C11 C12 C16 C25 C26 C27 C28 C29 C32 C35 C36 C37 C38 C39 C43 C45 C46 C49 C50 C51 C52 C59 C60 C61 C62 C63 C64: library part "Capacitor - Non Polarized", "Non Polarized Capacitor"
C2 C3 C17: library part "Capacitor - Polarized", "Polarized Capacitor"
CN1: library part CMP-002-00065-3, "USB-C Connector, 20 V, 1.25 A, -30 to 80 degC, RoHS, Tape and Reel", Connector Type=USB-C, Gender=Receptacle, Pins=28
D6: "Schottky Diodes & Rectifiers 10 V 3000 mA", ComponentLink1Description=Datasheet, ComponentLink1URL=https://www.smc-diodes.com/propdf/1N4148W%20N0571%20REV.E.pdf
D8 D9 D10: library part "TVS Diode", "TVS Diode"
D13: "General Purpose LED", ComponentLink1Description=Datasheet, ComponentLink1URL=https://www.smc-diodes.com/propdf/1N4148W%20N0571%20REV.E.pdf
D14 D15 D16 D17 D18 D19 D20 D21 D22 D23 D24 D25: "1N4148 General Purpose Switching Diode", ComponentLink1Description=Datasheet, ComponentLink1URL=https://www.smc-diodes.com/propdf/1N4148W%20N0571%20REV.E.pdf
FB2: library part "Ferrite Bead", "Ferrite Bead"
H1 H2 H3 H5 H34: library part "6-Pin Header", "6-Pin Header"
H4 H8 J1: library part "4-Pin Header", "4-Pin Header"
H6 H19 H20 H21 H22 H23 H24: library part "2-Pin Header", "2-Pin Header"
H7 H9 H14 H18 H25 H26: library part "12-Pin Header", "12-Pin Header"
H10 H11 H15: library part "3-Pin Header", "3-Pin Header"
H12 H13 H16 H17: library part "8-Pin Header", "8-Pin Header"
IC3: "Integrated Circuit", Manufacturer_Name="FTDI Chip", Mouser Part Number=895-FT4232HPQ-TRAY, Datasheet Link=https://www.ftdichip.com/Support/Documents/DataSheets/ICs/DS_FT4233HP.pdf, Height=0.8mm, Manufacturer_Part_Number=FT4232HPQ-TRAY, Mouser Price/Stock=https://www.mouser.co.uk/ProductDetail/FTDI/FT4232HPQ-TRAY?qs=DRkmTr78QATL4FSPfVZC7Q%3D%3D
J2: "Connector", Manufacturer_Name="Same Sky", Mouser Part Number=490-PJ-037AH, Arrow Part Number=PJ-037AH, Arrow Price/Stock=https://www.arrow.com/en/products/pj-037ah/cui-devices?region=nac, Datasheet Link=https://www.arrow.com/en/products/pj-037ah/cui-devices, Height=11.2mm, Manufacturer_Part_Number=PJ-037AH, Mouser Price/Stock=https://www.mouser.co.uk/ProductDetail/CUI-Devices/PJ-037AH?qs=WyjlAZoYn50M7m1AkzfPaQ%3D%3D
Q1 Q2 Q4 Q6 Q7 Q8: "Transistor BJT NPN", Arrow Part Number=BC817-40,215, Manufacturer_Name=Nexperia, Mouser Part Number=771-BC817-40-T/R, Arrow Price/Stock=https://www.arrow.com/en/products/bc817-40215/nexperia?region=europe, Datasheet Link=https://assets.nexperia.com/documents/data-sheet/BC817_SER.pdf, Height=1.1mm, Manufacturer_Part_Number=BC817-40,215, Mouser Price/Stock=https://www.mouser.co.uk/ProductDetail/Nexperia/BC817-40215?qs=me8TqzrmIYU%252B245p8hOLaQ%3D%3D
R1 R2 R3 R5 R15 R17 R18 R19 R33 R38 R40 R42 R44 R45 R47 R48 R49 R50 R51 R54 R56 R59 R64 R65 R68 R69 R70 R75 R77 R81 R102 R105 R106 R107 R108: library part Resistor, "Resistor"
R57 R72 R78: library part Potentiometer, "Potentionmeter"
R88: library part Resistor_1, "Resistor"
SW1 SW2 SW3 SW4 SW5 SW6: "Tactile Pushbutton - Contact Pad"
U1: "Power Supply", Manufacturer_Name=STMicroelectronics, Mouser Part Number=511-LD1086V33-DG, Arrow Part Number=LD1086V33-DG, Arrow Price/Stock=https://www.arrow.com/en/products/ld1086v33-dg/stmicroelectronics?region=europe, Datasheet Link=https://componentsearchengine.com/Datasheets/1/LD1086V33-DG.pdf, Height=4.6mm, Manufacturer_Part_Number=LD1086V33-DG, Mouser Price/Stock=https://www.mouser.co.uk/ProductDetail/STMicroelectronics/LD1086V33-DG?qs=kWQV1gtkNncEt67PbJzViw%3D%3D
U2: "5.0V Linear Voltage Regulator"
U3 U7 U13: "Integrated Circuit", Manufacturer_Name="Espressif Systems", Mouser Part Number=356-ESP32WRM32E164PH, Datasheet Link=https://www.google.com/url?sa=t&rct=j&q=&esrc=s&source=web&cd=&ved=2ahUKEwjLw4ysybv2AhXFzIUKHZUbB64QFnoECCwQAQ&url=https%3A%2F%2Fwww.espressif.com%2Fsites%2Fdefault%2Ffiles%2Fdocumentation%2Fesp32-wroom-32e_esp32-wroom-32ue_datasheet_en.pdf&usg=AOvVaw1xSL, Height=3.25mm, Manufacturer_Part_Number=ESP32-WROOM-32E-N8, Mouser Price/Stock=https://www.mouser.co.uk/ProductDetail/Espressif-Systems/ESP32-WROOM-32E-N8?qs=Li%252BoUPsLEnsLnZW%252BGLgUhw%3D%3D
U6 U9: "Shift Register"
U8: "Integrated Circuit", Manufacturer_Name="Texas Instruments", Mouser Part Number=595-LSF0204DPWR, Arrow Part Number=LSF0204DPWR, Arrow Price/Stock=https://www.arrow.com/en/products/lsf0204dpwr/texas-instruments?region=nac, Datasheet Link=http://www.ti.com/lit/gpn/lsf0204d, Height=1.2mm, Manufacturer_Part_Number=LSF0204DPWR, Mouser Price/Stock=https://www.mouser.co.uk/ProductDetail/Texas-Instruments/LSF0204DPWR?qs=ADSrZYdIRCcP9%252B%2FUL5YMBQ%3D%3D
U10: library part LMV324, "Quad General Purpose Op Amp", ComponentLink1Description=Datasheet, ComponentLink1URL=https://www.ti.com/lit/ds/symlink/lm224.pdf?
Y1: library part CMP-004-000000-1, Package=None, Availability=Unavailable, Component Type=Standard, Design Item ID=LFXTAL056346, MF="{'manufacturer': u'IQD Frequency Products'}", MP=LFXTAL056346, Pin Count=4, Price=None, Source=LFXTAL056346.SchLib

## Free pads (board coordinates)
  round 5.08 hole 3.2 unplated: M3_hole(0,0) M3_hole(0,123.571) M3_hole(145.923,0) M3_hole(145.923,123.571)

## Via types
v1: diameter 0.7, hole 0.35, Top Layer to Bottom Layer, tented both sides, 161 vias
v2: diameter 0.45, hole 0.225, Top Layer to Bottom Layer, tented both sides, 45 vias
v3: diameter 0.45, hole 0.225, Top Layer to Bottom Layer, 1 vias
v4: diameter 0.7, hole 0.225, Top Layer to Bottom Layer, tented both sides, 1 vias
v5: diameter 0.6, hole 0.3, Top Layer to Bottom Layer, tented both sides, 1 vias

## Nets (pads, with @x,y where several pads share a name; then routed paths per layer and width w, separated by ;. In a path a pad name is that pad's centre, name@x,y a point inside that pad or via, vN(x,y) a via of type N, cw(c..) or ccw(c..) an arc to the next point about the centre after c; other vN are vias at no path point)
3V3: C1.1 C2.1 C5.1 C8.1 C9.1 C11.1 C26.1 C27.1 C28.1 C29.1 C38.1 C39.1 C50.1 C51.1 FB2.1 H4.1 H5.1 H5.2 H5.3 H5.4 H5.5 H5.6 IC3.10 IC3.26 IC3.30 IC3.39 IC3.51 IC3.61 R1.1 R15.1 R17.2 R33.2 R40.1 R42.1 R45.2 R48.2 R49.2 R64.2 R102.1 U1.2 U3.2 U7.2 U8.1 U13.2 | length 96.3
  Top Layer w0.2: v2(120.523,68.453) 121.247,68.453 121.364,68.336 C27.1@121.364,67.183 122.301,67.183 122.771,67.653 IC3.39@124.085,67.653 ; 122.922,62.865 122.934,62.853 IC3.51@124.085,62.853 128.095,62.853 128.435,62.513 IC3.61@128.435,62.103 128.435,61.139 129.286,60.288 C39.1@129.286,59.384 C38.1@130.683,59.384 ; IC3.30@126.435,70.003 126.435,69.399 126.619,69.215 127.762,69.215 128.035,69.488 IC3.26@128.035,70.003 128.035,71.52 128.344,71.829 129.265,71.829 129.319,71.884 132.669,71.884 C26.1@132.715,71.93 133.429,71.93 v2(133.477,71.882) ; IC3.10@131.985,66.453 132.637,66.453 133.367,67.183 C29.1@135.049,67.183 135.001,67.231 v2(135.001,67.945)
  Top Layer w0.25: C5.1@112.268,26.872 C5.1@112.294,26.898 ; v1@113.766,26.898 v1(113.792,26.924)
  Top Layer w0.5: H5.1@7.747,10.287 H5.2@7.747,12.827 H5.3@7.747,15.367 7.747,16.625 ; H5.4@7.747,17.895 7.747,16.625 ; H5.4@7.747,17.907 H5.5@7.747,20.447 H5.6@7.747,22.987 ; v1(9.144,114.173) 10.212,114.173 C9.1@10.339,114.046 ; v1(10.414,16.625) 7.747,16.625 ; R15.1@13.208,119.38 v1(13.208,120.65) ; U3.2@17.92,119.052 v1(20.627,119.052) ; v1(25.654,89.916) R49.2@26.936,89.916 ; C51.1@57.225,115.951 v1(58.547,115.951) ; C50.1@57.999,122.936 v1(59.055,123.992) ; v1(60.833,120.142) R102.1@62.115,120.142 ; v1(61.976,69.85) R48.2@63.512,69.85 ; U13.2@67.069,119.814 67.122,119.761 v1(68.834,119.761) ; U8.1@72.816,75.709 72.816,77.515 v1(73.406,78.105) ; v1(75.819,92.329) 76.962,93.472 R64.2@77.978,93.472 ; v1(106.807,124.206) 106.807,123.103 C1.1@106.847,123.063 ; v1(108.458,114.681) 109.78,114.681 C11.1@109.907,114.554 ; R1.1@112.28,120.65 v1(112.28,122.035) ; C5.1@112.294,26.898 v1@113.766,26.898 ; U7.2@116.459,119.634 v1(118.999,119.634) ; v2(121.031,57.658) FB2.1@121.031,58.763 ; v2(121.872,61.897) C28.1@121.872,62.865 122.922,62.865 ; R17.2@127.151,92.202 127.151,91.035 127.635,90.551 128.397,90.551 v1(128.524,90.678) ; R45.2@136.386,59.182 v1(138.176,59.182) ; R42.1@136.386,60.96 v1(138.176,60.96) ; R40.1@136.386,62.611 v4(138.176,62.611) ; R33.2@136.386,64.262 v2(138.049,64.262) ; v2(137.668,53.467) C2.1@137.668,50.125 140.111,52.568 U1.2@144.272,52.568
+5.0: C3.1 C7.1 C17.1 C32.1 C37.1 H3.1 H3.2 H3.3 H3.4 H3.5 H3.6 H11.1 H15.1 U2.3 U4.2 U6.10 U6.16 U8.14 U9.10 U9.16 | length 249.8
  Top Layer w0.25: H3.2@98.4,2.111 98.425,2.086 H3.1@98.425,-0.127 ; 130.154,41.402 130.3,41.256
  Top Layer w0.5: H15.1@35.687,12.573 H11.1@35.687,7.366 35.687,5.207 38.227,2.667 81.407,2.667 ; U8.14@72.816,69.833 92.6,69.833 96.647,65.786 96.647,56.006 U4.2@96.774,55.879 103.974,55.879 C17.1@104.013,55.84 110.784,55.84 115.951,50.673 115.951,41.402 ; v1(80.518,9.017) 80.518,5.757 82.397,3.878 ; U6.10@83.574,4.258 83.549,4.233 82.752,4.233 82.397,3.878 ; U6.16@83.574,8.158 84.074,8.158 84.847,8.931 85.258,8.931 v1(85.344,9.017) ; v1(97.536,29.972) 98.283,30.719 U9.10@98.283,31.869 ; H3.2@98.425,2.413 98.425,3.918 98.279,4.064 97.536,4.064 ; v1(103.505,29.972) 103.569,30.035 106.172,30.035 ; C7.1@106.172,26.872 106.172,30.035 ; v1(118.491,41.402) 115.951,41.402 ; v1(125.73,41.402) 129.794,41.402 ; C3.1@129.794,47.665 129.794,41.402 ; 130.154,41.402 129.794,41.402 ; U2.3@130.3,36.961 130.3,41.256 ; 81.407,2.667 82.042,3.302 82.042,3.523 82.397,3.878 ; 81.407,2.667 82.696,2.667 82.55,2.813 95.904,2.813 97.155,4.064 97.536,4.064 ; 97.536,4.064 H3.3@98.425,4.953 H3.4@98.425,7.493 H3.5@98.425,10.033 H3.6@98.425,12.573 101.702,15.85 102.183,15.85 U9.16@102.183,31.869 104.737,31.869 106.067,33.199 C32.1@106.172,33.199 ; 106.172,30.035 C32.1@106.172,33.199 ; C32.1@106.172,33.199 C37.1@109.347,33.199 111.431,33.199 115.951,37.719 115.951,41.402
  Bottom Layer w0.5: v1(80.518,9.017) v1(85.344,9.017) ; v1(97.536,29.972) v1(103.505,29.972) ; v1(118.491,41.402) v1(125.73,41.402)
+12.0: C4.1 C6.1 F1.2 H1.1 H1.2 H1.3 H1.4 H1.5 H1.6 U1.3 U2.1 | length 44.8
  Top Layer w0.5: U2.1@130.3,32.381 133.824,32.381 135.912,34.469 C4.1@136.017,34.469 C6.1@138.303,34.469 143.458,34.469 H1.6@147.066,30.861 ; F1.2@137.795,21.336 v1(137.795,24.003) ; U1.3@144.272,50.018 145.806,48.484 145.806,44.821 H1.1@147.066,43.561 H1.2@147.066,41.021 H1.3@147.066,38.481 H1.4@147.066,35.941 H1.5@147.066,33.401 H1.6@147.066,30.861 ; v1(147.066,28.194) H1.6@147.066,30.861
AP_DTR: IC3.38 Q2.2 R2.1 | length 37.9
  Top Layer w0.25: v1(118.237,81.153) 118.237,73.456 123.615,68.078 124.06,68.078 IC3.38@124.085,68.053 ; v1(124.206,89.916) 124.206,92.087 R2.1@124.321,92.202 v1(124.321,93.46) ; v1(126.988,93.46) 126.988,94.516 Q2.2@127.143,94.671
  Bottom Layer w0.25: v1(118.237,81.153) 118.237,89.643 118.51,89.916 v1(124.206,89.916) ; v1(124.321,93.46) v1(126.988,93.46)
AP_EN: C10.1 D22.2 D23.2 R1.2 U7.3 | length 33.3
  Top Layer w0.25: v1(113.74,117.781) C10.1@113.74,119.126 ; C10.1@113.74,119.021 113.98,118.781 114.085,118.781 114.502,118.364 U7.3@116.459,118.364 116.134,118.689 115.691,118.689 113.78,120.6 R1.2@113.78,120.65 ; v1(113.792,99.06) 113.792,97.691 114.259,97.224 114.259,97.024 114.509,96.774 D23.2@114.709,96.774 D22.2@114.709,92.964
  Bottom Layer w0.25: v1(113.74,117.781) 113.74,99.112 v1(113.792,99.06)
AP_EN_AUTO: D23.1 Q1.3 | length 3.6
  Top Layer w0.25: D23.1@118.209,96.774 118.409,96.774 119.552,95.631 Q1.3@121.301,95.631
AP_EN_KEY: C12.2 D22.1 H6.2 SW5.3 SW5.4 | length 21.9
  Top Layer w0.25: C12.2@111.125,85.038 111.341,85.255 115.608,85.255 H6.2@115.824,85.471 115.858,85.437 119.89,85.437 SW5.4@119.924,85.403 ; D22.1@118.209,92.964 118.409,92.964 119.924,91.449 SW5.4@119.924,85.403 ; SW5.3@124.424,85.403 SW5.4@119.924,85.403
AP_GPIO0: D24.2 D25.2 H26.10 R17.1 U7.25 | length 38.3
  Top Layer w0.25: R17.1@128.651,92.202 130.892,92.202 131.273,92.583 D24.2@131.473,92.583 131.673,92.583 131.923,92.833 131.923,93.033 134.523,95.633 134.523,96.27 134.773,96.52 D25.2@134.973,96.52 134.973,98.072 v1(133.731,99.314) ; v1(137.668,104.394) U7.25@133.959,104.394 134.259,104.394 143.403,95.25 H26.10@146.177,95.25
  Bottom Layer w0.25: v1(133.731,99.314) 137.668,103.251 v1(137.668,104.394)
AP_GPIO2: H26.11 U7.24 | length 19.6
  Top Layer w0.25: U7.24@130.924,103.144 133.076,103.144 143.383,92.837 146.05,92.837 H26.11@146.177,92.71
AP_GPIO4: H26.9 U7.26 | length 15.5
  Top Layer w0.25: U7.26@133.959,105.664 138.303,105.664 H26.9@146.177,97.79
AP_GPIO5: H26.6 U7.29 | length 13.9
  Top Layer w0.25: U7.29@133.959,109.474 142.113,109.474 H26.6@146.177,105.41
AP_GPIO12: H25.11 U7.14 | length 17.3
  Top Layer w0.25: H25.11@102.743,95.631 107.396,95.631 116.159,104.394 U7.14@116.459,104.394
AP_GPIO13: H25.12 U7.16 | length 22.4
  Top Layer w0.25: H25.12@102.743,93.091 106.807,93.091 115.316,101.6 119.52,101.6 120.764,102.844 U7.16@120.764,103.144
AP_GPIO14: H25.10 U7.13 | length 16.8
  Top Layer w0.25: H25.10@102.743,98.171 108.666,98.171 116.159,105.664 U7.13@116.459,105.664
AP_GPIO15: H26.12 U7.23 | length 22.6
  Top Layer w0.25: U7.23@129.654,103.144 129.979,102.819 129.979,101.542 130.302,101.219 133.477,101.219 144.526,90.17 H26.12@146.177,90.17
AP_GPIO16: H26.8 U7.27 | length 15
  Top Layer w0.25: U7.27@133.959,106.934 139.573,106.934 H26.8@146.177,100.33
AP_GPIO17: H26.7 U7.28 | length 14.4
  Top Layer w0.25: U7.28@133.959,108.204 140.843,108.204 H26.7@146.177,102.87
AP_GPIO18: H26.5 U7.30 | length 13.4
  Top Layer w0.25: U7.30@133.959,110.744 143.383,110.744 H26.5@146.177,107.95
AP_GPIO19: H26.4 U7.31 | length 12.8
  Top Layer w0.25: U7.31@133.959,112.014 144.653,112.014 H26.4@146.177,110.49
AP_GPIO21: H26.3 U7.33 | length 12.8
  Top Layer w0.25: U7.33@133.959,114.554 134.259,114.554 135.783,113.03 H26.3@146.177,113.03
AP_GPIO22: H26.2 U7.36 | length 13.4
  Top Layer w0.25: U7.36@133.959,118.364 143.383,118.364 H26.2@146.177,115.57
AP_GPIO23: H26.1 U7.37 | length 12.8
  Top Layer w0.25: U7.37@133.959,119.634 144.653,119.634 H26.1@146.177,118.11
AP_GPIO25: H25.7 U7.10 | length 15.2
  Top Layer w0.25: H25.7@102.743,105.791 112.476,105.791 116.159,109.474 U7.10@116.459,109.474
AP_GPIO26: H25.8 U7.11 | length 15.8
  Top Layer w0.25: H25.8@102.743,103.251 111.206,103.251 116.159,108.204 U7.11@116.459,108.204
AP_GPIO27: H25.9 U7.12 | length 16.3
  Top Layer w0.25: H25.9@102.743,100.711 109.936,100.711 116.159,106.934 U7.12@116.459,106.934
AP_GPIO32: H25.5 U7.8 | length 14.2
  Top Layer w0.25: H25.5@102.743,110.871 104.786,110.871 105.01,111.096 115.241,111.096 116.159,112.014 U7.8@116.459,112.014
AP_GPIO33: H25.6 U7.9 | length 14.7
  Top Layer w0.25: H25.6@102.743,108.331 105.156,110.744 U7.9@116.459,110.744
AP_GPIO34: H25.3 U7.6 | length 14.3
  Top Layer w0.25: H25.3@102.743,115.951 114.762,115.951 116.159,114.554 U7.6@116.459,114.554
AP_GPIO35: H25.4 U7.7 | length 13.8
  Top Layer w0.25: H25.4@102.743,113.411 116.332,113.411 U7.7@116.459,113.284
AP_GPIO36: H25.1 U7.4 | length 15.3
  Top Layer w0.25: H25.1@102.743,121.031 104.931,118.843 106.953,118.843 108.701,117.094 U7.4@116.459,117.094
AP_GPIO39: H25.2 U7.5 | length 14.8
  Top Layer w0.25: H25.2@102.743,118.491 106.807,118.491 108.995,116.303 114.908,116.303 115.061,116.149 116.134,116.149 U7.5@116.459,115.824
AP_IO0_AUTO: D25.1 Q2.3 | length 2.7
  Top Layer w0.25: Q2.3@129.143,95.631 130.384,95.631 131.273,96.52 D25.1@131.473,96.52
AP_IO0_KEY: D24.1 H24.2 SW6.3 SW6.4 | length 17.7
  Top Layer w0.25: SW6.4@128.56,85.403 SW6.3@133.06,85.403 ; D24.1@134.973,92.583 134.973,87.166 133.21,85.403 SW6.3@133.06,85.403 ; H24.2@138.176,85.471 138.142,85.437 133.094,85.437 SW6.3@133.06,85.403
AP_RTS: IC3.36 Q1.2 R3.1 | length 41.8
  Top Layer w0.25: v1(118.999,80.264) 118.999,73.494 123.615,68.878 124.06,68.878 IC3.36@124.085,68.853 ; R3.1@124.345,100.33 124.345,100.28 123.301,99.236 Q1.2@123.301,96.591 123.651,96.591 123.851,96.391 123.851,95.678 124.714,94.815 124.714,93.98 125.476,93.218 v1(125.476,88.9)
  Bottom Layer w0.25: v1(118.999,80.264) 118.999,88.754 119.145,88.9 v1(125.476,88.9)
AP_RXD: IC3.35 R108.1 | length 30.9
  Top Layer w0.25: IC3.35@124.085,69.253 123.81,69.253 119.738,73.325 119.738,73.891 122.809,76.962 132.588,76.962 135.128,79.502 R108.1@141.732,79.502
AP_TXD: IC3.34 R107.1 | length 32
  Top Layer w0.25: IC3.34@124.835,70.003 124.835,70.745 124.46,71.12 122.555,71.12 120.5,73.175 120.5,73.383 123.571,76.454 132.969,76.454 135.128,78.613 142.983,78.613 143.208,78.838 143.208,79.327 R107.1@143.383,79.502
AP_U0RXD: R107.2 U7.34 | length 44.8
  Top Layer w0.25: U7.34@133.959,115.824 v1(143.383,115.824) ; R107.2@143.383,80.602 143.446,80.665 143.446,88.075 v1(143.51,88.138)
  Bottom Layer w0.25: v1(143.383,115.824) 143.446,115.76 143.446,88.201 v1(143.51,88.138)
AP_U0TXD: R108.2 U7.35 | length 44.3
  Top Layer w0.25: U7.35@133.959,117.094 v1(141.732,117.094) ; R108.2@141.732,80.602 v1(141.732,90.17)
  Bottom Layer w0.25: v1(141.732,90.17) v1(141.732,117.094)
CLIENT_DTR: IC3.21 Q6.2 R47.1 | length 132.5
  Top Layer w0.25: R47.1@23.102,89.916 23.102,89.966 25.702,92.566 26.359,92.566 Q6.2@26.559,92.766 28.265,92.766 v1(29.718,91.313) ; v2(129.921,70.993) 129.921,70.939 130.035,70.825 IC3.21@130.035,70.003
  Bottom Layer w0.25: v1(29.718,91.313) 33.401,87.63 41.529,87.63 43.18,85.979 43.18,68.091 43.326,67.945 122.555,67.945 123.063,68.453 129.775,68.453 129.921,68.599 v2(129.921,70.993)
CLIENT_EN: C16.1 D14.2 D15.2 R15.2 U3.3 | length 44.5
  Top Layer w0.25: C16.1@11.632,117.602 17.74,117.602 U3.3@17.92,117.782 16.306,117.782 15.083,119.005 15.033,119.005 14.605,119.433 v1(14.605,121.285) ; v1(14.224,96.52) 14.224,93.246 D15.2@14.252,93.218 D14.2@14.252,89.154
  Bottom Layer w0.25: v1(14.224,96.52) 14.224,120.782 14.605,121.163 v1(14.605,121.285)
CLIENT_EN_AUTO: D15.1 Q4.3 | length 3.4
  Top Layer w0.25: D15.1@17.752,93.218 19.732,93.218 20.494,93.98 Q4.3@20.844,93.98
CLIENT_EN_KEY: C35.2 D14.1 H19.2 SW1.3 SW1.4 | length 22.2
  Top Layer w0.25: C35.2@10.795,84.276 10.9,84.276 13.619,86.995 18.415,86.995 ; H19.2@15.113,84.963 18.307,84.963 18.415,84.855 ; D14.1@17.752,89.154 17.952,89.154 18.202,88.904 18.202,88.704 18.415,88.491 18.415,86.995 ; SW1.3@23.84,84.768 SW1.4@19.34,84.768 19.253,84.855 18.415,84.855 ; 18.415,84.855 18.415,86.995
CLIENT_GPIO0: D16.2 D17.2 H9.10 R49.1 U3.25 | length 36.1
  Top Layer w0.25: R49.1@28.436,89.916 30.943,89.916 31.169,89.69 31.369,89.69 31.369,90.786 31.515,90.932 33.274,90.932 35.024,92.682 D17.2@35.024,94.234 35.024,96.294 v1(33.274,98.044) ; v1(33.528,103.632) 33.65,103.632 33.83,103.812 U3.25@35.42,103.812 35.72,103.812 41.996,97.536 H9.10@46.609,97.536
  Bottom Layer w0.25: v1(33.274,98.044) 33.274,103.256 33.528,103.51 v1(33.528,103.632)
CLIENT_GPIO2: H9.11 U3.24 | length 17.5
  Top Layer w0.25: U3.24@32.385,102.562 32.385,102.262 39.651,94.996 H9.11@46.609,94.996
CLIENT_GPIO4: H9.9 U3.26 | length 13.3
  Top Layer w0.25: U3.26@35.42,105.082 35.72,105.082 40.726,100.076 H9.9@46.609,100.076
CLIENT_GPIO5: H9.6 U3.29 | length 11.7
  Top Layer w0.25: U3.29@35.42,108.892 35.72,108.892 36.916,107.696 H9.6@46.609,107.696
CLIENT_GPIO12: H7.11 U3.14 | length 19.7
  Top Layer w0.25: H7.11@2.667,93.091 6.899,93.091 17.62,103.812 U3.14@17.92,103.812
CLIENT_GPIO13: H7.12 U3.16 | length 25.2
  Top Layer w0.25: H7.12@2.667,90.551 5.969,90.551 16.51,101.092 21.952,101.092 22.098,101.238 22.098,102.435 U3.16@22.225,102.562
CLIENT_GPIO14: H7.10 U3.13 | length 19.2
  Top Layer w0.25: H7.10@2.667,95.631 5.618,95.631 14.744,104.757 17.595,104.757 U3.13@17.92,105.082
CLIENT_GPIO15: H9.12 U3.23 | length 19.9
  Top Layer w0.25: U3.23@31.115,102.562 31.115,102.262 38.733,94.644 44.421,94.644 H9.12@46.609,92.456
CLIENT_GPIO16: H9.8 U3.27 | length 12.7
  Top Layer w0.25: U3.27@35.42,106.352 42.873,106.352 H9.8@46.609,102.616
CLIENT_GPIO17: H9.7 U3.28 | length 12.2
  Top Layer w0.25: U3.28@35.42,107.622 35.72,107.622 36.638,106.704 43.019,106.704 44.566,105.156 H9.7@46.609,105.156
CLIENT_GPIO18: H9.5 U3.30 | length 11.2
  Top Layer w0.25: U3.30@35.42,110.162 35.494,110.236 H9.5@46.609,110.236
CLIENT_GPIO19: H9.4 U3.31 | length 11.7
  Top Layer w0.25: U3.31@35.42,111.432 35.72,111.432 37.064,112.776 H9.4@46.609,112.776
CLIENT_GPIO21: H4.3 H9.3 U3.33 | length 21.8
  Top Layer w0.25: U3.33@35.42,113.972 35.72,113.972 37.064,115.316 44.831,115.316 ; v1(43.18,116.967) 44.831,115.316 ; v1(43.18,121.539) H4.3@43.18,124.714 ; H9.3@46.609,115.316 44.831,115.316
  Bottom Layer w0.25: v1(43.18,116.967) v1(43.18,121.539)
CLIENT_GPIO22: H4.2 H9.2 U3.36 | length 20
  Top Layer w0.25: U3.36@35.42,117.782 35.494,117.856 45.72,117.856 45.847,117.729 47.498,117.729 47.698,117.929 47.698,122.736 H4.2@45.72,124.714
CLIENT_GPIO23: H9.1 U3.37 | length 11.7
  Top Layer w0.25: U3.37@35.42,119.052 35.72,119.052 37.064,120.396 H9.1@46.609,120.396
CLIENT_GPIO25: H7.7 U3.10 | length 17.6
  Top Layer w0.25: H7.7@2.667,103.251 7.523,103.251 12.839,108.567 17.595,108.567 U3.10@17.92,108.892
CLIENT_GPIO26: H7.8 U3.11 | length 18.1
  Top Layer w0.25: H7.8@2.667,100.711 6.888,100.711 13.474,107.297 17.595,107.297 U3.11@17.92,107.622
CLIENT_GPIO27: H7.9 U3.12 | length 18.6
  Top Layer w0.25: H7.9@2.667,98.171 6.253,98.171 14.109,106.027 17.595,106.027 U3.12@17.92,106.352
CLIENT_GPIO32: H7.5 U3.8 | length 16.5
  Top Layer w0.25: H7.5@2.667,108.331 4.703,110.367 12.098,110.367 13.163,111.432 U3.8@17.92,111.432
CLIENT_GPIO33: H7.6 U3.9 | length 17.1
  Top Layer w0.25: H7.6@2.667,105.791 8.158,105.791 12.204,109.837 17.595,109.837 U3.9@17.92,110.162
CLIENT_GPIO34: H7.3 U3.6 | length 16.6
  Top Layer w0.25: H7.3@2.667,113.411 6.994,113.411 8.391,112.014 12.319,112.014 13.952,113.647 17.595,113.647 U3.6@17.92,113.972
CLIENT_GPIO35: H7.4 U3.7 | length 16
  Top Layer w0.25: H7.4@2.667,110.871 11.889,110.871 13.395,112.377 17.595,112.377 U3.7@17.92,112.702
CLIENT_GPIO36: H7.1 U3.4 | length 16.1
  Top Layer w0.25: H7.1@2.667,118.491 6.858,118.491 8.89,116.459 17.867,116.459 U3.4@17.92,116.512
CLIENT_GPIO39: H7.2 U3.5 | length 15.5
  Top Layer w0.25: H7.2@2.667,115.951 2.935,115.683 17.179,115.683 17.62,115.242 U3.5@17.92,115.242
CLIENT_IO0_AUTO: D17.1 Q6.3 | length 3.2
  Top Layer w0.25: Q6.3@28.559,93.726 28.909,93.726 29.417,94.234 D17.1@31.524,94.234